# Altium PCB Control-Board-v4.0.PcbDoc (part 2 of 3)
Units mil, origin at the board's own origin, x right, y up, seen from the top; angles counter-clockwise.
Board outline 1665.35 x 1665.35 mil, 2 copper layers (Top Layer, Bottom Layer), stack 61.811 mil thick; 81 components, 75 nets, 357 pads, 145 vias.
Unrouted connection lines stored in the file: 74.
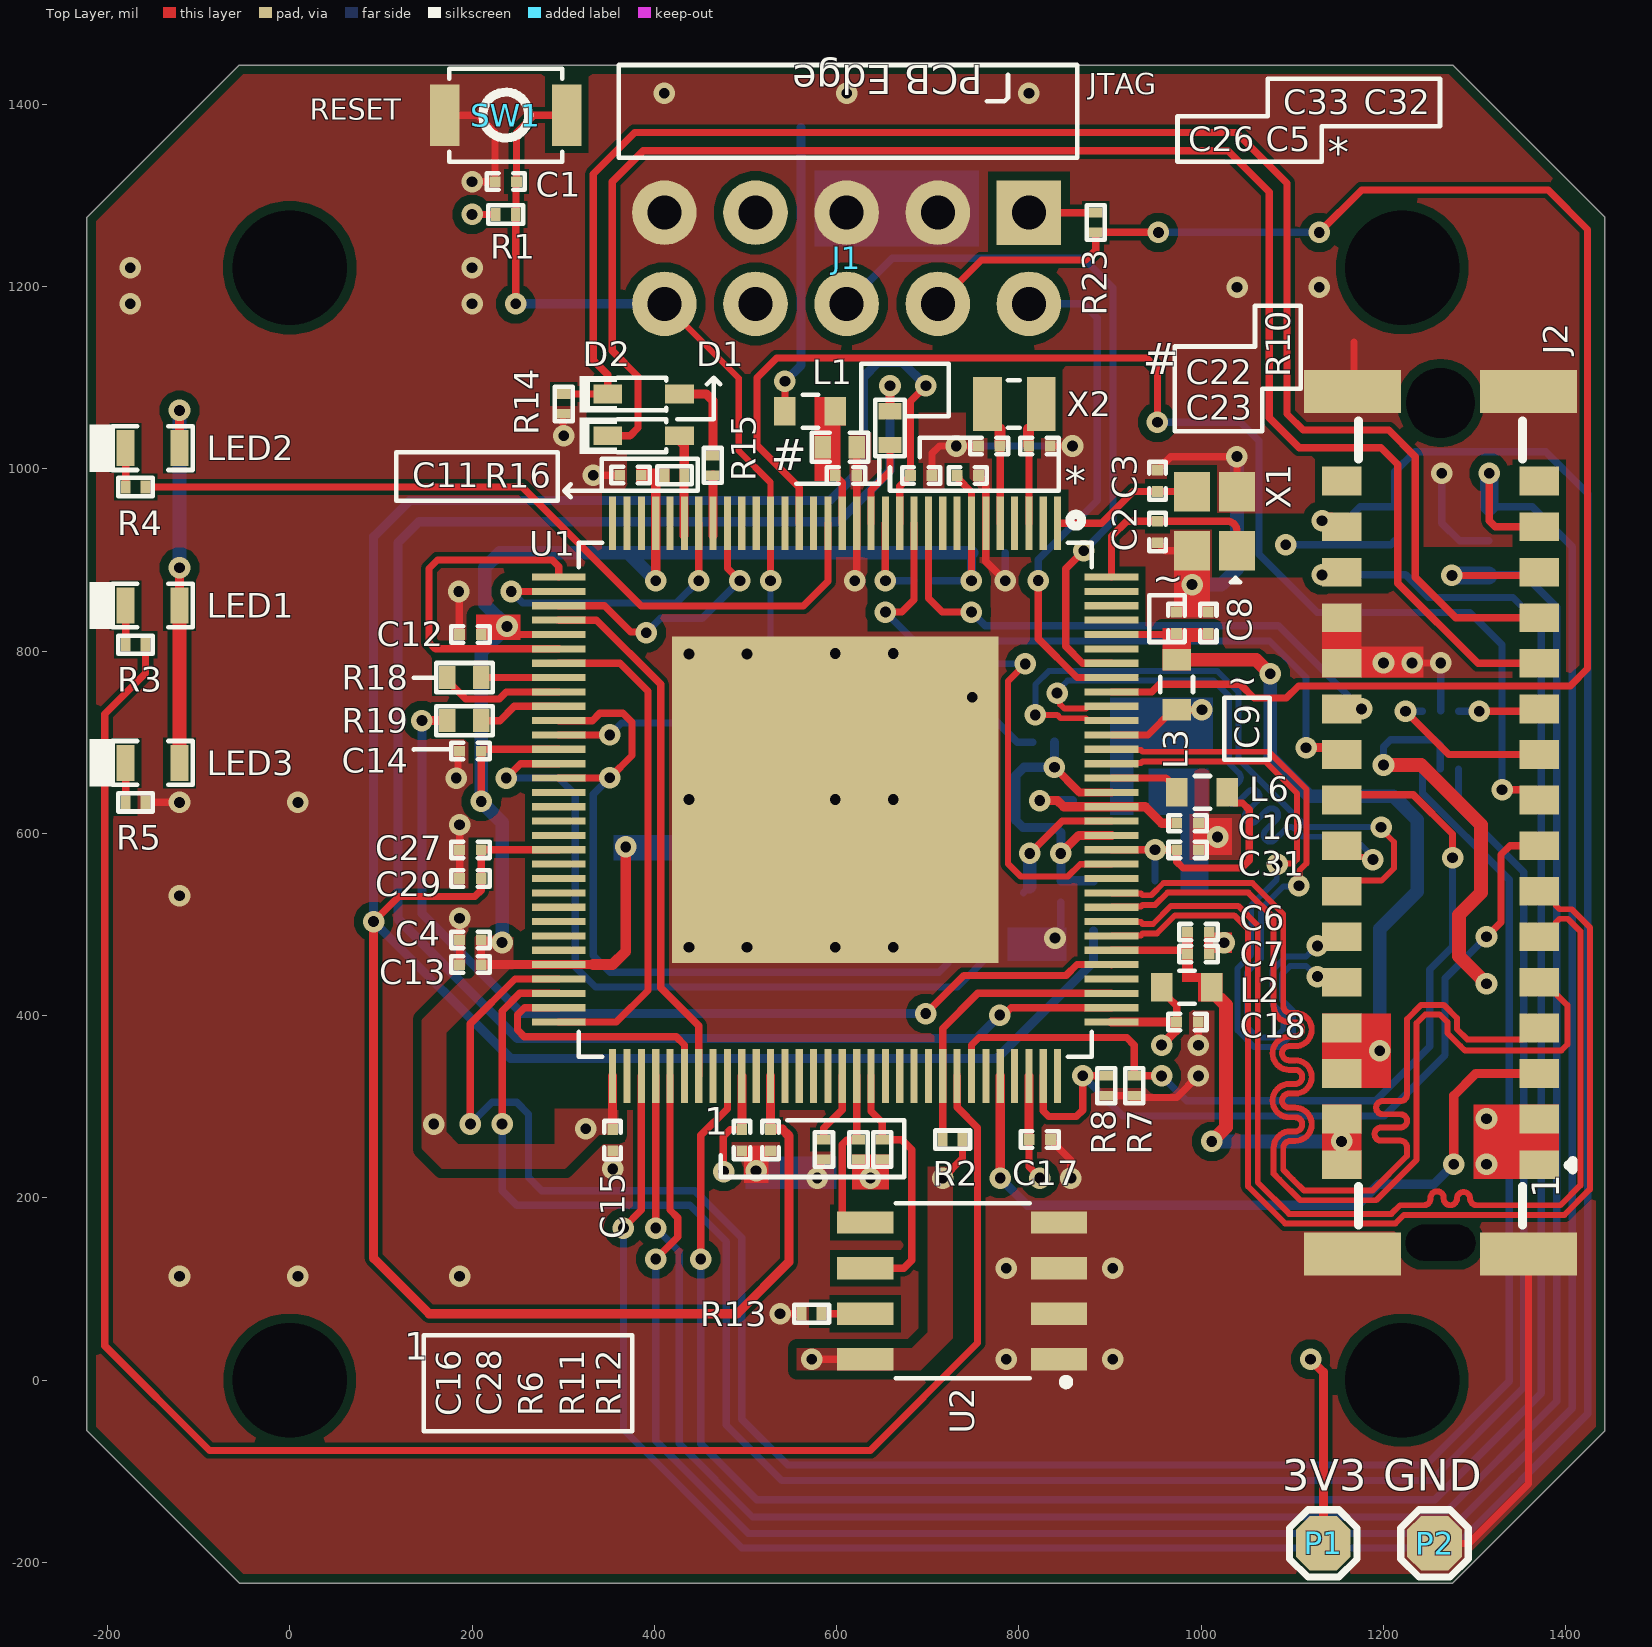
[diagram p0: Top Layer view]

## Part data (continued)
U3: "MAGNETIC ANGLE SENSOR", Manufacturer=Infineon, Manufacturer Part Number=TLE5012BE5000, Package Quantity=2500, Supplier Part Number 1=2238590, Category="Magnetic Sensors", ComponentLink1Description=http://www.mouser.com/ds/2/196/Infineon-TLE5012B_Exxxx-DS-v02_00-en-540142.pdf?src-supplier=Mouser, ComponentLink1URL=http://www.mouser.com/ds/2/196/Infineon-TLE5012B_Exxxx-DS-v02_00-en-540142.pdf?src-supplier=Mouser, Interface=SPI,PWM, Number of Pins=8, Packaging="Tape and Reel", RoHS=Yes, RoHS Compliant=Yes, Series=TLE5012, Supplier 1=RSComponents
X1: library part ABM10AIG-25.000MHZ-4Z-T3, "CRYSTAL 25.0000MHZ 10PF SMD", Case/Package=SMD/SMT, ESR (Equivalent Series Resistance)=60R, Frequency Stability=50ppm, Frequency Tolerance=30ppm, LCSC Part Number=C1985447, Load Capacitance=10pF, Max Operating Temperature=125°C, Min Operating Temperature=-40°C, Ratings=AEC-Q200, Supplier Part Number=4127685, Category=Crystals, ComponentLink1Description=LCSC, ComponentLink2Description=http://www.mouser.com/ds/2/3/ABM10AIG-783578.pdf?src-supplier=Mouser, ComponentLink2URL=http://www.mouser.com/ds/2/3/ABM10AIG-783578.pdf?src-supplier=Mouser, ComponentLink3Description=https://abracon.com/AIGcrystals/ABM10AIG.pdf?src-supplier=Digi-Key, ComponentLink3URL=https://abracon.com/AIGcrystals/ABM10AIG.pdf?src-supplier=Digi-Key, ComponentLink4Description=https://abracon.com/Support/flyer/AutoGrade-AIG-Crystals.pdf?src-supplier=Digi-Key, ComponentLink4URL=https://abracon.com/Support/flyer/AutoGrade-AIG-Crystals.pdf?src-supplier=Digi-Key, Frequency=25MHz, Item Type=Crystal, Mounting Technology="Surface Mount", Packaging="Cut Tape", Pricing="3000=0.41, 6000=0.4, 9000=0.395, 12000=0.39, 15000=0.38 (USD)", RoHS=Yes, RoHS Compliant=Yes, Series=ABM10AIG, Stock=6000, Supplier="Future Electronics"
X2: library part CM8V-T1A-32.768KHZ-6PF-20PPM-TA-QC, "Crystal 32.768KHZ 6.0PF SMD", Manufacturer="Micro Crystal", Supplier Part Number 1=2195-CM8V-T1A-32.768KHZ-6PF-20PPM-TA-QCCT-ND, Manufacturer Part Number=CM8V-T1A-32.768KHZ-6PF-20PPM-TA-QC, Pricing 1="1=0.68000, 10=0.56400, 50=0.50740, 100=0.45100, 500=0.42844 (USD)", RoHS=No, Stock 1=21000, Supplier 1=Digi-Key

## Free pads (board coordinates)
  round 0 hole 125.98: MH2(0,0) MH3(0,1220.47) MH3(1220.47,0) MH3(1220.47,1220.47)

## Via types
v1: diameter 23.62, hole 11.81, Top Layer to Bottom Layer, tented both sides, 145 vias

## Nets (pads, with @x,y where several pads share a name; then routed paths per layer and width w, separated by ;. In a path a pad name is that pad's centre, name@x,y a point inside that pad or via, vN(x,y) a via of type N, cw(c..) or ccw(c..) an arc to the next point about the centre after c; other vN are vias at no path point)
#DRV-DIR: D4.4 U1.62 | length 2388.4
  Top Layer w8: v1(233,281.14) 233,405.08 252.41,424.49 U1.62@295.21,424.49
  Bottom Layer w8: v1(233,281.14) 233,208 249,192 439.22,192 479,152.22 479,-49 539.95,-109.95 1252.05,-109.95 1354,-8 1354,557.58 1282.24,629.33 D4.4@1282.24,670.59
#DRV-STEP: D4.6 U1.61 | length 2448.3
  Top Layer w8: v1(198.19,281.14) 198.19,391.24 247.19,440.24 U1.61@295.21,440.24
  Bottom Layer w8: v1(198.19,281.14) 222,304.95 249.05,304.95 262,292 262,222.61 276.61,208 444.28,208 496,156.28 496,-42.67 546.33,-93 1246.2,-93 1338,-1.2 1338,549.03 1242.87,644.15 D4.6@1242.87,670.59
CLK_25: R10.2 U1.98 | length 1957.4
  Top Layer w8: v1(779.07,400.64) 783.29,400.64 791.39,408.74 U1.98@901.51,408.74
  Top Layer w10: R10.2@658.54,1063.14 v1(658.54,1091)
  Bottom Layer w10: v1(658.54,1091) 658.54,998.01 602.42,941.89 141.83,941.89 118.74,918.79 118.74,506.01 249.9,374.85 753.27,374.85 v1(779.07,400.64)
DRV-CS: D3.1 J2.A15 U1.69 | length 2719.4
  Top Layer w8: v1(401.51,133) 425.67,157.16 425.67,178.28 417.26,186.69 U1.69@417.26,333.94 ; v1(1316,995) 1316,943 1322.46,936.54 J2.A15@1370.83,936.54
  Bottom Layer w8: v1(401.51,133) 401.51,-66.41 503.13,-168.02 1269.67,-168.02 1407,-30.7 1407,914.6 1363.2,958.4 D3.1@1315.57,958.4 D3.1@1316,958.83
  Bottom Layer w20: D3.1@1316,958.83 v1(1316,995)
DRV-DIAG0: J2.B10 U1.11 | length 731.7
  Top Layer w8: v1(653.48,842.8) 671.59,842.8 684.98,856.18 U1.11@684.98,940.24
  Top Layer w10: v1(1115,694) 1146.83,694 J2.B10@1154.29,686.54
  Bottom Layer w8: v1(653.48,842.8) 685.23,811.04 1074.94,811.04 1115,770.98 v1(1115,694)
DRV-DIAG1: J2.A9 U1.19 | length 1447.4
  Top Layer w8: U1.19@558.99,940.24 558.93,940.3 558.93,979.41 512.66,1025.68 512.66,1099.82 534.36,1121.53 940.49,1121.53 952,1110.01 v1(952,1051) ; v1(1330.07,647.76) 1359.6,647.76 J2.A9@1370.83,636.54
  Bottom Layer w8: v1(952,1051) 1043.05,1051 1063.39,1030.66 1063.39,906.28 1127.31,842.36 1294.51,842.36 1330.07,806.8 v1(1330.07,647.76)
DRV-DIR: D4.3 J2.A11 | length 89.6
  Top Layer w8: v1(1305,734) 1368.29,734 J2.A11@1370.83,736.54
  Bottom Layer w8: D4.3@1282.27,734 v1(1305,734)
DRV-EN: J2.B11 U1.10 | length 629.5
  Top Layer w8: U1.10@700.72,940.24 700.72,857.8 715.72,842.8 v1(747.91,842.8)
  Top Layer w10: J2.B11@1154.29,736.54 v1(1175.94,736.54)
  Bottom Layer w8: v1(747.91,842.8) 762.91,827.79 1084.69,827.79 v1(1175.94,736.54)
DRV-MISO: D3.4 J2.B14 U1.73 | length 2538.8
  Top Layer w8: v1(451.05,133) 451.05,268.77 480.25,297.98 U1.73@480.25,333.94 ; v1@1132.64,886.54 J2.B14@1154.29,886.54
  Bottom Layer w8: v1(451.05,133) 451.05,-69.75 512.32,-131.02 1256.27,-131.02 1373,-14.29 1373,828 1342.13,858.87 1248.97,858.87 1224.24,883.6 v1(1132.64,883.6)
DRV-MOSI: D3.6 J2.B15 U1.67 | length 2969.3
  Top Layer w8: v1(366.08,167) 385.76,186.69 U1.67@385.76,333.94 ; v1@1132.64,948.28 1142.54,948.28 J2.B15@1154.29,936.54
  Bottom Layer w8: v1(366.08,167) 366.08,-54.13 495.97,-184.02 1276.7,-184.02 1424,-36.72 1424,972.82 1378.01,1018.81 1234.52,1018.81 1212.43,996.71 D3.6@1212.43,958.4 1174.27,958.4 1158.87,943 v1(1132.64,943)
DRV-SCK: D3.3 J2.A14 U1.68 | length 2561.2
  Top Layer w8: v1(401.51,167) U1.68@401.51,333.94 ; v1(1275,883) 1367.29,883 J2.A14@1370.83,886.54
  Bottom Layer w8: v1(401.51,167) 427.24,141.28 427.24,-69.5 507.76,-150.02 1263.12,-150.02 1390,-23.14 1390,848 1354.4,883.6 D3.3@1315.57,883.6 D3.3@1314.98,883
  Bottom Layer w20: v1(1275,883) D3.3@1314.98,883
DRV-STEP: D4.1 J2.A10 | length 185.1
  Top Layer w8: v1(1224.13,734) 1271.59,686.54 J2.A10@1370.83,686.54
  Bottom Layer w8: v1(1224.13,734) D4.1@1242.87,733.98
EEPSIZE: R3.1 U1.89 | length 2143.9
  Top Layer w8: R3.1@-158.35,807 -158.35,775.65 -203,731 -203,38 -88.01,-76.99 636.81,-76.99 754.62,40.81 754.62,277.01 732.22,299.4 U1.89@732.22,333.94
ENC_CS: R20.1 U1.46 | length 912.2
  Top Layer w8: v1(237.44,660.71) 253.18,676.46 U1.46@295.21,676.46
  Bottom Layer w8: v1(237.44,660.71) 294.89,660.71 313.38,642.21 313.38,453.45 335.35,431.48 732.63,431.48 768.92,467.77 R20.1@768.92,563.58
ENC_DATA: R22.1 U1.43 U1.47 | length 833.6
  Top Layer w8: U1.47@295.21,660.71 295.28,660.77 v1@350.77,660.77 ; U1.43@295.21,723.7 332.06,723.7 340.2,731.84 365.52,731.84 375.47,721.89 375.47,685.47 v1(351,661)
  Bottom Layer w8: v1(351,661) 333.06,643.06 333.06,466.03 351.55,447.55 712.32,447.55 722.24,457.47 R22.1@722.24,473.35
ENC_SCK: R21.1 U1.44 | length 539
  Top Layer w8: U1.44@295.21,707.95 295.25,707.99 355.62,707.99 v1@355.66,708.03
  Bottom Layer w8: v1(351,708.03) 363.97,721 753.81,721 768.92,705.89 R21.1@768.92,656.89
ERRLED: R4.1 U1.17 | length 877.9
  Top Layer w8: R4.1@-158.35,980 254.96,980 385.57,849.38 563.38,849.38 590.49,876.49 U1.17@590.49,940.24
GND: C1.2 C2.1 C3.1 C4.2 C5.2 C6.2 C7.2 C8.2 C9.2 C10.2 C11.2 C12.2 C13.2 C14.2 C15.2 C16.2 C17.2 C18.2 C19.2 C20.2 C21.2 C22.2 C23.2 C24.2 C25.2 C26.2 C27.2 C28.2 C29.2 C30.2 C31.2 C32.1 C33.1 C34.1 D3.2 D4.2 D5.2 J1.3 J1.5 J1.9 J2.B12 J2.B13 J2.MP1 J2.MP2 J2.MP3 J2.MP4 P2.1 R5.1 R6.2 R7.2 R8.2 R13.2 R14.1 R17.2 SW1.2 U1.6 U1.15 U1.129 U2.1 U2.2 U2.3 U2.4 U3.7 X1.2 X1.4 | length 2451.3
  Top Layer w8: R5.1@-158.35,634 v1(-120.95,634) ; SW1.2@170.07,1388 206,1388 225.19,1368.81 C1.2@225.19,1315 v1(200,1315) ; v1(182.69,660.71) 184.53,662.55 184.53,690.36 C14.2@186.38,692.2 ; v1(185.32,865.37) 185.85,864.84 185.85,818.72 C12.2@186.38,818.19 ; C13.2@186.38,455.98 v1(186.38,506.98) ; C29.2@186.38,550.47 v1(186.38,609.53) ; v1@299.88,1035.85 R14.1@299.88,1060.06 ; v1(333.02,993) C11.2@361.96,993 ; v1(354.27,231.81) C15.2@354.27,251.61 ; v1(538,73) R13.2@561.78,73 ; v1(578.72,221.76) 578.72,225.99 582.72,229.99 582.72,241.03 584.03,242.35 R6.2@586,242.35 ; v1(619.86,877.24) 621.98,879.37 U1.15@621.98,940.24 C23.2@621.98,992.72 C22.2@621.98,1023.68 ; C26.2@704.66,992.72 704.66,1016.89 712.77,1025 C33.1@755.61,1025 ; C5.2@755.61,992.72 763.72,984.61 763.72,940.36 763.65,940.3 U1.6@763.72,940.24 763.72,898.43 v1(784.91,877.24) ; C32.1@834.35,1025 v1(858.76,1025) ; C17.2@834.58,264 857,241.58 v1(857,221.76) ; R8.2@895.69,312.28 R7.2@926.6,312.28 R7.2@927.91,310.97 ; R7.2@921,312 922.87,310.13 973.09,310.13 v1(996.9,333.94) ; C2.1@952,918.9 960.86,910.04 X1.4@990,910.04 v1(990,873) ; C3.1@952,998.62 966.73,1013.35 v1(1039.21,1013.35) X1.2@1039.21,975 X1.2@1024.7,989.52 ; C18.2@996.62,392.99 996.76,392.85 996.76,367.75 v1(996.9,367.61) ; C7.2@1008.71,467.8 C6.2@1008.71,491.54 ; J2.MP3@1167.54,1094.19 1167.54,1139 ; v1(1231.39,787) v1(1262.78,787) ; P2.1@1256,-179 1293.47,-179 1359.02,-113.45 J2.MP1@1359.02,138.31
  Bottom Layer w8: v1(731.19,1025) v1(858.76,1025) ; v1(748.78,749.31) 798.09,700 C24.2@815.38,700 ; v1@785,877.34 784.95,877.39 C21.2@785,908 C21.2@785,908 ; R17.2@805,474.72 815.44,485.16 v1(839.58,485.16) 846,491.58 C25.2@846,524.41 ; D4.2@1262.78,734.2 v1(1262.78,787) ; v1(1264,995) 1264,940.3 1283.3,921 D3.2@1315.57,921
  Bottom Layer w15: v1(990,873) 1022.1,873 1039.21,890.12 v1(1039.21,1013.35)
  other v1: 786,23 902.98,23 -120.95,114 8.95,114 186.38,114 786,123 902.98,123 511.65,229.98 438,475 501.64,475 598.36,475 662,475 1025,480 -120.95,531.45 1018,596 8.95,634 438,637.09 598.36,637.09 662,637.09 1200,787 438.06,796.71 501.7,796.71 598.36,797.45 662,797.45 300.68,1036.13 -175,1181 200,1181 1039.32,1199.18 1129.62,1199.18 -175,1220.47 200,1220.47 411,1412 611,1412 811,1412
LINK0: J2.A8 R8.1 U1.95 | length 885.5
  Top Layer w8: U1.95@826.71,333.94 826.71,295.31 832.72,289.31 863.05,289.31 870,296.26 v1@870,333.94 ; v1(870,334) v1@870,333.94 ; R8.1@895.69,333.94 v1@870,333.94 ; v1(1313,486.54) 1328.91,502.44 1328.91,576.75 1338.69,586.54 J2.A8@1370.83,586.54
  Bottom Layer w8: v1(870,334) 914.05,289.95 1200.7,289.95 1267.57,356.82 1267.57,441.1 v1(1313,486.54)
LINK1: J2.B9 R7.1 U1.90 | length 998.3
  Top Layer w8: U1.90@747.97,333.94 747.97,367.84 756.11,375.99 918.22,375.99 926.6,367.61 R7.1@926.6,333.94 v1(956.48,333.94) ; J2.B9@1154.29,636.54 1160.18,642.43 1232.62,642.43 1275.75,599.3 v1(1275.75,573.38)
  Bottom Layer w8: v1(956.48,333.94) 983.77,306.65 1191.12,306.65 1250.73,366.25 1250.73,450.58 1275.75,475.6 v1(1275.75,573.38)
MCU-RX: D1.1 R16.1 U1.27 | length 113.9
  Top Layer w10: D1.1@422,1036.32 432.83,1025.49 R16.1@432.83,993 ; U1.27@432.69,926.92 R16.1@432.69,993
MCU-TX: R15.2 U1.25 | length 66.1
  Top Layer w10: U1.25@464.19,926.92 R15.2@464.19,993
NetD2_1: D2.1 R15.1 | length 105.3
  Top Layer w10: D2.1@422,1082 D2.1@427.51,1082 456.91,1082 464.19,1074.72 R15.1@464.19,1014.65
NetL6_1: L6.1 U1.114 | length 80.6
  Top Layer w8: U1.114@901.51,660.71 961.47,660.71 973.28,648.9 L6.1@973.28,644.96
NetLED1_2: LED1.2 R3.2 | length 43
  Top Layer w8: R3.2@-180,807 LED1.2@-180,850
NetLED2_2: LED2.2 R4.2 | length 42.7
  Top Layer w8: R4.2@-180,980 LED2.2@-180,1022.67
NetLED3_2: LED3.2 R5.2 | length 43.3
  Top Layer w8: R5.2@-180,634 LED3.2@-180,677.33
NetR6_1: R6.1 U1.81 | length 78.3
  Top Layer w8: R6.1@586,264 586,276.65 606.24,296.89 U1.81@606.24,333.94
NetR9_1: R9.1 U1.13 | length 94.5
  Top Layer w8: v1(653.48,877.24) U1.13@653.48,940.24
  Bottom Layer w8: v1(653.48,877.24) R9.1@684.98,877.24
NetR10_1: R10.1 U1.14 | length 93.4
  Top Layer w8: U1.14@637.73,940.24 637.73,976.34 658.54,997.15 R10.1@658.54,1025